# Altium PCB EEM_FMC_Carrier.PcbDoc (part 16 of 19)
Units mm, origin at the board's own origin, x right, y up, seen from the top; angles counter-clockwise.
Board outline 222.9 x 100 mm, 6 copper layers (TopLayer, MidLayer1, MidLayer2, SignalLayer1, Internal Plane 1, BottomLayer), stack 1.528 mm thick; 790 components, 743 nets, 3570 pads, 2277 vias.
Unrouted connection lines stored in the file: 3.
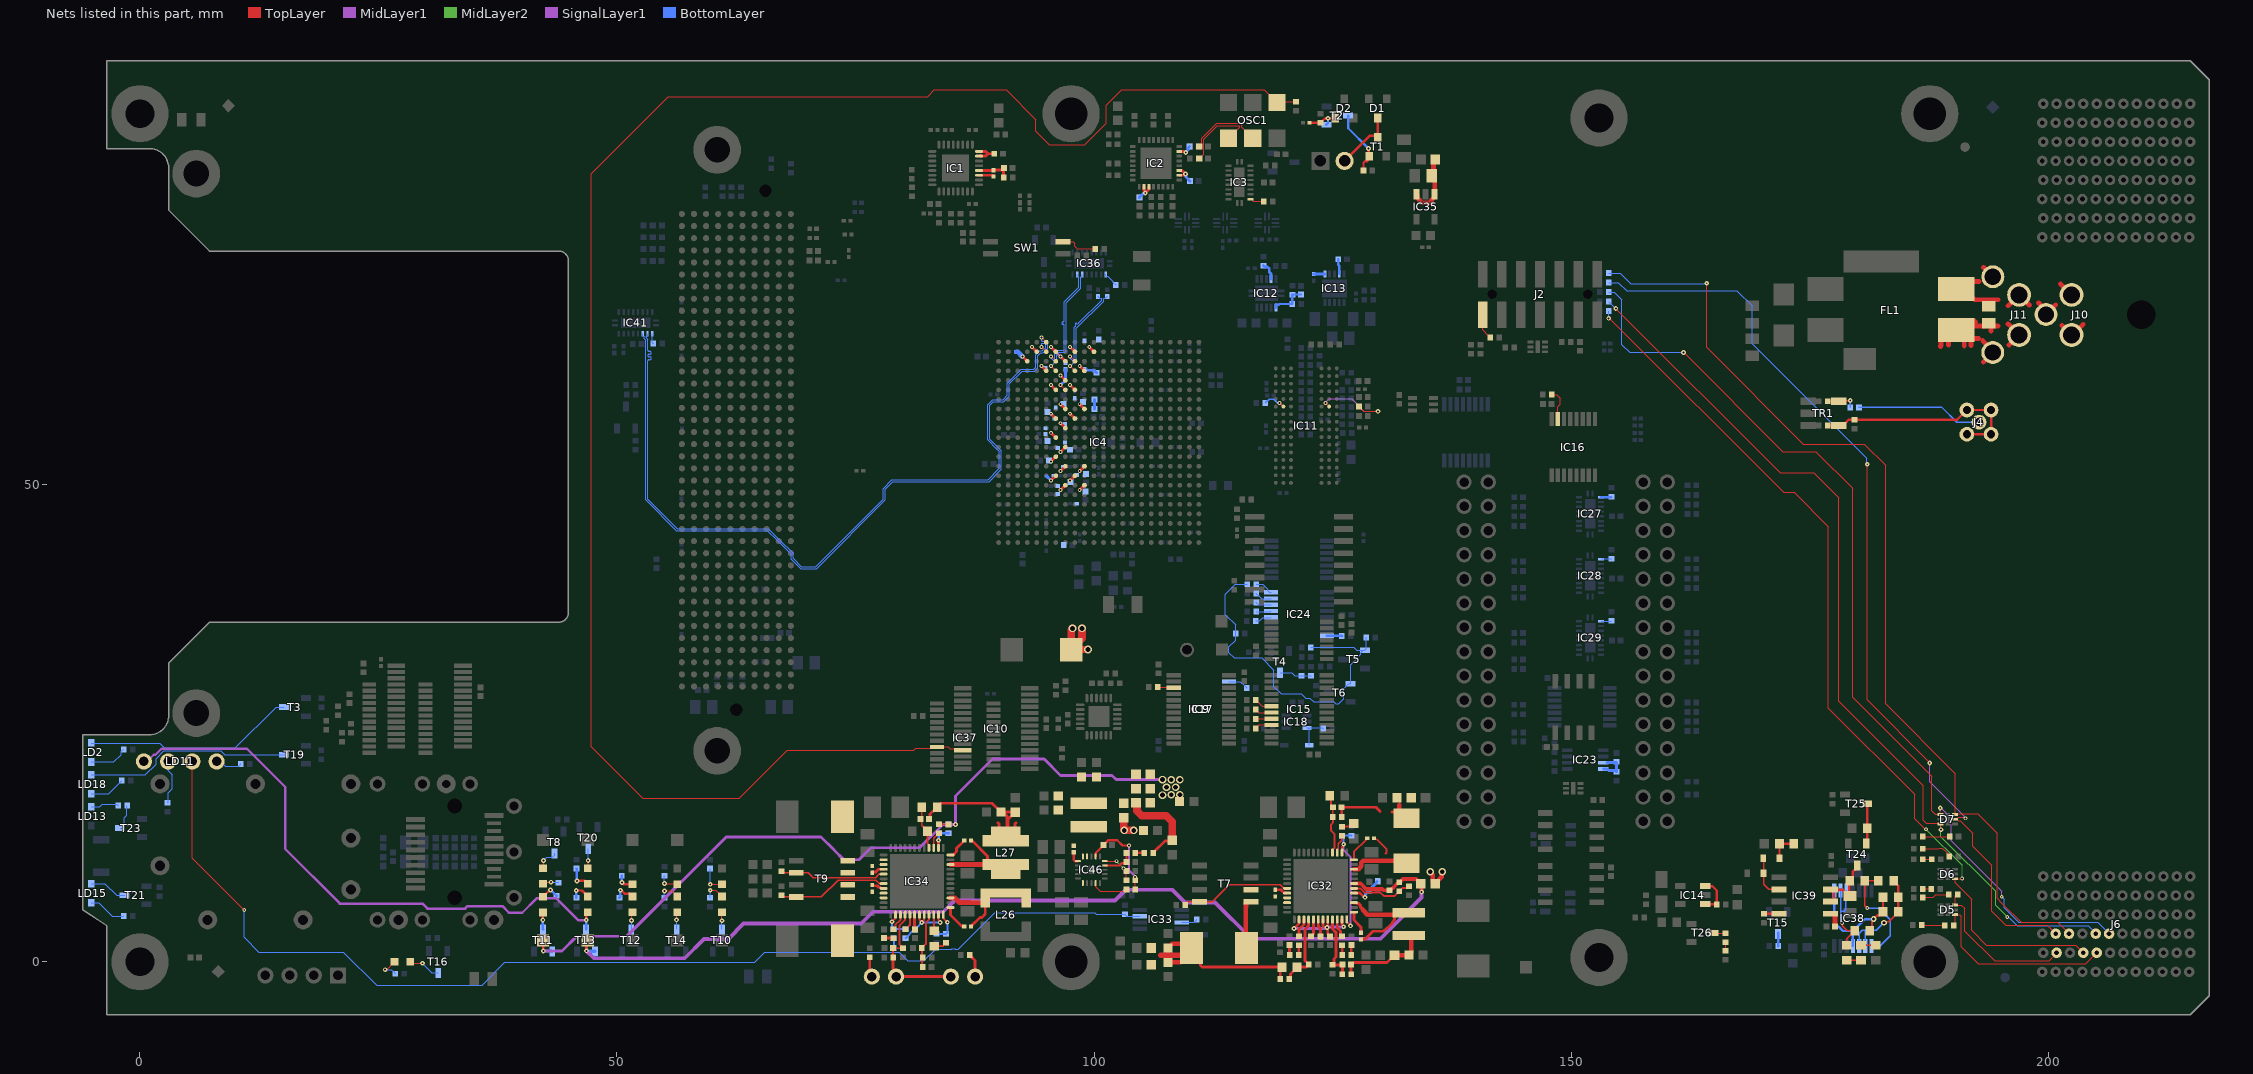
[diagram p18: the nets of this part, all layers, seen from the top]

## Via types
v1: diameter 0.4, hole 0.2, TopLayer to BottomLayer, tented both sides, 1032 vias
v2: diameter 0.5, hole 0.2, TopLayer to BottomLayer, tented both sides, 979 vias
v3: diameter 0.5, hole 0.2, TopLayer to BottomLayer, 162 vias
v4: diameter 0.8, hole 0.5, TopLayer to BottomLayer, tented both sides, 102 vias
v5: diameter 0.6, hole 0.3, TopLayer to BottomLayer, tented both sides, 2 vias

## Nets (pads, with @x,y where several pads share a name; then routed paths per layer and width w, separated by ;. In a path a pad name is that pad's centre, name@x,y a point inside that pad or via, vN(x,y) a via of type N, cw(c..) or ccw(c..) an arc to the next point about the centre after c; other vN are vias at no path point) (continued)
MGT_RXC3_N: C59.2 IC4.C9 | length 9.7
  TopLayer w0.085: v1(97.498,63.45) IC4.C9@97.998,62.95
  BottomLayer w0.085: v1(97.498,63.45) 97.558,63.39 97.558,63.239 97.741,63.056 97.811,63.056 97.948,63.193 97.948,63.288 97.948,66.495 98.052,66.598 98.082,66.629 ccw(c98.016,66.694) 98.082,66.759 98.074,66.766 cw(c98.14,66.832) 98.074,66.897 cw(c98.14,66.832) 98.205,66.897 98.212,66.89 ccw(c98.278,66.956) 98.343,66.89 98.474,67.021 100.794,69.341 100.794,69.493 100.744,69.543 100.608,69.543 100.425,69.725 C59.2@100.425,69.75
MGT_RXC3_P: C58.2 IC4.D9 | length 9.7
  TopLayer w0.085: v1(97.498,62.45) IC4.D9@97.998,61.95
  BottomLayer w0.085: v1(97.498,62.45) 97.506,62.45 98.16,63.105 98.16,66.407 98.203,66.45 101.006,69.253 101.006,69.493 101.056,69.543 101.193,69.543 101.375,69.725 C58.2@101.375,69.75
MGT_TX2_N: IC4.A6 IC41.4 | length 82.7
  TopLayer w0.085: v1(94.498,65.45) IC4.A6@94.998,64.95
  BottomLayer w0.085: IC41.4@52.7,65.825 52.7,65.65 52.783,65.568 52.794,65.568 52.844,65.518 52.844,65.312 53.013,65.143 53.013,48.412 56.225,45.2 65.775,45.2 66.725,44.25 68.25,42.725 68.25,42.212 69.249,41.213 70.913,41.213 78.112,48.412 78.112,49.525 78.912,50.325 88.993,50.325 90.291,51.623 90.291,53.584 89.075,54.8 89.075,58.325 89.45,58.7 90.55,58.7 91.125,59.275 91.125,60.575 92.456,61.907 92.723,61.907 93.273,61.907 93.77,61.907 94.117,62.254 94.117,63.542 94.4,63.825 94.688,63.825 95.166,64.304 95.166,64.808 94.995,64.98 94.919,65.056 94.548,65.056 94.498,65.106 v1(94.498,65.45)
MGT_TX2_P: IC4.B6 IC41.3 | length 82.6
  TopLayer w0.085: v1(94.498,64.45) IC4.B6@94.998,63.95
  BottomLayer w0.085: IC41.3@53.2,65.825 53.2,65.65 53.118,65.568 53.106,65.568 53.056,65.518 53.056,65.4 53.225,65.231 53.225,64.5 53.225,64.118 ccw(c53.367,64.118) 53.367,63.975 53.451,63.975 cw(c53.451,63.833) 53.594,63.833 cw(c53.451,63.833) 53.451,63.69 53.367,63.69 ccw(c53.367,63.548) 53.225,63.548 ccw(c53.367,63.548) 53.367,63.405 53.451,63.405 cw(c53.451,63.263) 53.594,63.263 cw(c53.451,63.263) 53.451,63.12 53.367,63.12 ccw(c53.367,62.978) 53.225,62.978 53.225,62.65 53.225,48.5 56.313,45.412 65.863,45.412 66.875,44.4 67.025,44.25 68.462,42.813 68.462,42.3 69.337,41.425 70.825,41.425 77.9,48.5 77.9,49.613 78.824,50.537 88.906,50.537 90.079,51.71 90.079,53.496 89.775,53.8 88.863,54.712 88.863,58.413 89.362,58.912 90.462,58.912 90.913,59.363 90.913,60.663 92.369,62.119 92.635,62.119 93.361,62.119 93.682,62.119 93.905,62.341 93.905,63.629 94.312,64.037 94.6,64.037 94.954,64.391 94.954,64.721 94.845,64.83 94.647,64.83 94.633,64.844 94.548,64.844 94.498,64.794 v1(94.498,64.45)
MGT_TX3_N: IC4.C7 IC36.8 | length 12
  TopLayer w0.085: v1(95.498,63.45) IC4.C7@95.998,62.95
  BottomLayer w0.085: v1(95.498,63.45) 95.558,63.39 95.558,63.234 95.737,63.056 95.807,63.056 95.886,63.135 95.886,63.684 96.289,64.087 96.825,64.087 96.875,64.137 96.875,66.675 96.875,66.718 ccw(c96.758,66.718) 96.758,66.835 96.751,66.835 cw(c96.751,66.953) 96.751,67.07 96.758,67.07 ccw(c96.758,67.188) 96.875,67.188 96.875,67.392 96.875,69.169 98.392,70.686 98.392,71.743 98.342,71.793 98.33,71.793 98.248,71.875 IC36.8@98.248,72.05
MGT_TX3_P: IC4.D7 IC36.7 | length 12
  TopLayer w0.085: v1(95.498,62.45) IC4.D7@95.998,61.95
  BottomLayer w0.085: v1(95.498,62.45) 95.501,62.45 96.098,63.047 96.098,63.596 96.377,63.875 96.913,63.875 97.087,64.049 97.087,67.392 97.087,69.081 98.604,70.598 98.604,71.743 98.654,71.793 98.665,71.793 98.748,71.875 IC36.7@98.748,72.05
MGTAVCC: C99.2 C170.2 C172.2 C242.2 IC4.D6 IC4.D10 IC4.E8 IC4.F7 IC4.F9 L18.2 | length 7.3
  TopLayer w0.3: v1(94.498,62.45) IC4.D6@94.998,61.95 ; v1(95.498,60.45) IC4.F7@95.998,59.95 ; v1(96.498,61.45) IC4.E8@96.998,60.95 ; v1(97.498,60.45) IC4.F9@97.998,59.95 ; v1(98.498,62.45) IC4.D10@98.998,61.95
  TopLayer w0.8: L18.2@103.1,15.1 103.1,13.848 v4(103.175,13.773) v4(104.175,13.773)
  BottomLayer w0.3: C170.2@98.998,62.1 98.998,62.075 99.048,62.025 99.302,62.025 99.316,62.011 99.987,62.011 C99.2@100.248,61.75
MGTAVTT: C156.2 C168.2 C169.2 IC4.B5 IC4.B7 IC4.B9 IC4.B11 IC4.C4 IC4.C8 L23.2 R26.1 | length 10.3
  TopLayer w0.3: v1(92.498,63.45) IC4.C4@92.998,62.95 ; v1(93.498,64.45) IC4.B5@93.998,63.95 ; v1(95.498,64.45) IC4.B7@95.998,63.95 ; v1(96.498,63.45) IC4.C8@96.998,62.95 ; v1(97.498,64.45) IC4.B9@97.998,63.95 ; v1(99.498,64.45) IC4.B11@99.998,63.95
  TopLayer w0.5: v4(135.248,9.45) 135.248,9.369 135.498,9.119 135.498,8.45 L23.2@135.748,8.2 136.441,8.893 v4@136.441,9.393
  MidLayer1 w0.3: v1(95.498,64.45) v1(96.498,63.45)
  BottomLayer w0.3: v1(96.498,63.45) 96.998,62.95 R26.1@96.998,62.78
  BottomLayer w0.5: C168.2@91.848,63.95 91.998,63.95 v1(92.498,63.45)
  other v4: 136.498,9.45
NetC3_1: C3.1 J4.1 | length 13.2
  BottomLayer w0.16: C3.1@180.174,58.117 188.883,58.117 190.433,56.567 J4.1@192.761,56.567
NetC3_2: C3.2 R1.1 TR1.4 | length 3.1
  TopLayer w0.16: R1.1@176.931,58.762 TR1.4@178.046,58.762 ; TR1.4@178.051,58.767 178.117,58.833 v2@179.264,58.833
  BottomLayer w0.16: C3.2@179.274,58.117 v2(179.274,58.842)
NetC8_2: C8.2 IC1.4 R10.1 R12.2 | length 3.6
  TopLayer w0.3: IC1.4@87.948,82.95 89.438,82.95 R10.1@89.498,83.01 ; R10.1@89.484,82.982 90.33,82.982 C8.2@90.548,83.2 ; R12.2@90.528,82.2 C8.2@90.528,83.04
NetC10_2: C10.2 IC2.2 IC2.3 | length 2.4
  TopLayer w0.3: IC2.2@108.948,82.45 109.421,82.45 109.536,82.565 v2(109.591,82.565) 109.206,82.95 IC2.3@108.948,82.95
  BottomLayer w0.3: v2(109.591,82.565) 109.629,82.527 109.629,82.269 C10.2@110.073,81.825
NetC15_2: C15.2 IC1.7 IC1.8 | length 2.8
  TopLayer w0.3: IC1.7@87.948,84.45 88.648,84.45 88.898,84.7 ; IC1.8@87.948,84.95 88.648,84.95 88.898,84.7 ; C15.2@89.548,84.7 88.898,84.7
NetC16_2: C16.2 IC2.7 | length 1.6
  TopLayer w0.3: IC2.7@108.948,84.95 109.434,84.95 109.559,84.825 v2(109.613,84.825) v2@109.613,84.771
  BottomLayer w0.3: v2(109.613,84.825) 109.613,84.85 109.863,85.101 109.863,85.315 C16.2@110.023,85.475
NetC21_2: C21.2 IC2.26 IC2.27 | length 2.1
  TopLayer w0.3: v2@105.248,80.779 IC2.26@105.248,81.25 ; v2(105.373,80.6) 105.748,80.975 IC2.27@105.748,81.25
  BottomLayer w0.3: C21.2@104.748,80.125 105.185,80.562 105.335,80.562 v2(105.373,80.6)
NetC60_1: C60.1 IC46.6 IC46.19 IC46.20 L8.1
NetC60_2: C60.2 IC46.1 | length 1.3
  TopLayer w0.25: C60.2@97.875,11.475 97.875,10.7 98.025,10.55 IC46.1@98.325,10.55
NetC73_1: C73.1 D2.1 R34.1 T2.1 | length 3.7
  TopLayer w0.25: C73.1@122.598,87.95 R34.1@123.748,87.95 123.768,87.95 123.933,88.115 123.933,88.135 124.181,88.383 124.481,88.383 v2(124.523,88.425) 124.568,88.38 125.218,88.38 D2.1@125.298,88.3
  BottomLayer w0.25: T2.1@124.348,87.75 124.523,87.925 v2(124.523,88.425)
NetC92_2: C92.2 IC12.1 R71.2 R72.2 | length 3.9
  BottomLayer w0.25: IC12.1@119.07,68.573 119.07,68.848 119.095,68.873 119.37,68.873 119.447,68.95 R71.2@120.778,68.95 120.778,69.911 R72.2@120.795,69.928 120.815,69.948 C92.2@121.695,69.948
NetC154_2: C154.2 IC39.6 IC39.7 R265.2 T24.3 | length 6.5
  TopLayer w0.25: IC39.6@177.55,6.34 177.55,7.548 178.519,7.548 178.666,7.401 178.666,7.298 C154.2@178.988,6.976 ; C154.2@179.241,6.898 179.153,6.985 179.153,8.453 179.525,8.825 179.525,8.996 179.55,9.021 179.55,9.45 180,9.9 T24.3@180,10.1
NetC165_2: C165.2 IC39.5 | length 1.8
  TopLayer w0.5: IC39.5@177.198,5.045 177.633,5.045 177.683,4.995 C165.2@177.683,3.713
NetC166_2: C166.2 D13.1 R268.2 | length 3
  TopLayer w0.25: D13.1@171.86,10.85 171.857,10.854 C166.2@171.857,12.361 171.861,12.365 R268.2@173.345,12.365
NetC186_2: C186.2 IC23.7 IC23.8 R101.1 | length 3.5
  BottomLayer w0.3: IC23.8@153.398,20.225 153.748,20.225 153.923,20.05 154.643,20.05 R101.1@154.773,19.92 154.773,20.9 IC23.7@153.785,20.9
NetC201_2: C201.2 IC35.1 IC35.3 L29.2 | length 6.8
  TopLayer w0.5: IC35.3@133.8,80.472 IC35.3@133.8,80.452 133.85,80.402 133.85,80.152 134.111,79.891 134.111,79.762 134.31,79.563 135.19,79.563 135.389,79.762 135.389,79.891 135.7,80.202 IC35.1@135.7,80.452 ; C201.2@135.4,82.402 135.4,82.227 135.709,81.918 IC35.1@135.709,80.461 ; C201.2@135.4,82.577 135.587,82.764 135.587,83.912 L29.2@135.775,84.1
NetC227_1: C227.1 IC32.40 R184.1 R185.2 | length 8
  TopLayer w0.3: R184.1@120.468,-1.8 120.608,-1.66 120.608,-1.265 121.298,-0.575 C227.1@121.298,-0.55 122.278,-0.55 122.368,-0.46 122.388,-0.46 122.528,-0.32 R185.2@122.528,-0.3 122.528,-0.28 122.388,-0.14 122.368,-0.14 122.123,0.105 122.123,3.4 122.498,3.775 IC32.40@122.498,4.45
NetC227_2: C227.2 C228.2 C229.2 L9.1 L10.2 L11.1 R184.2 | length 20.2
  TopLayer w0.3: L10.2@110.498,0.2 110.848,0.2 111.148,-0.1 111.148,-0.374 111.324,-0.55 C227.2@119.698,-0.55 119.528,-0.72 R184.2@119.528,-1.8
  TopLayer w0.5: C229.2@107.748,1.2 107.748,0.7 C228.2@107.748,-0.05 109.098,-0.05 109.348,0.2 L10.2@109.498,0.2 ; C229.2@107.748,1.45 108.198,1.9 109.648,1.9 L10.2@110.098,1.45
  TopLayer w0.6: 106.998,0.7 107.748,0.7 109.348,0.7 L10.2@110.098,1.45
NetC237_1: C237.1 IC32.33 IC32.34 L10.1 T7.5 T7.6 | length 5.4
  TopLayer w0.5: L10.1@115.898,1.45 115.898,5.745 115.923,5.77 115.923,6.245 115.973,6.295 T7.5@116.448,6.295
NetC237_2: C237.2 IC32.32 | length 1.4
  TopLayer w0.3: C237.2@118.998,7.55 119.573,7.55 119.812,7.311 119.862,7.311 119.973,7.2 IC32.32@120.248,7.2
NetC238_2: C238.2 R189.1 | length 1.1
  TopLayer w0.3: C238.2@120.498,1.75 120.498,0.73 R189.1@120.528,0.7
NetC241_2: C241.2 IC46.17 R196.1 R289.1 | length 9.5
  TopLayer w0.125: R196.1@104.345,7.6 R289.1@104.345,8.55
  TopLayer w0.25: IC46.17@100.175,11.05 100.175,11.4 C241.2@101,12.225 101.376,12.601 101.376,12.624 101.501,12.749 102.43,12.749 102.992,12.187 v1(103.663,12.187) ; v1(104.305,8.901) 104.325,8.881 104.325,8.57 R289.1@104.345,8.55
  SignalLayer1 w0.25: v1(103.663,12.187) 103.663,9.587 104.23,9.02 104.23,9.017 104.305,8.942 v1(104.305,8.901)
NetC248_1: C248.1 IC32.3 L19.1 | length 12.9
  TopLayer w0.3: C248.1@127.998,2.35 128.029,2.381 128.429,2.381 129.248,3.2 130.348,3.2 130.709,3.561 130.776,3.561 131.273,4.058 131.273,4.175 131.502,4.404 131.502,4.795 131.646,4.939 131.842,5.135 L19.1@132.998,5.135
  TopLayer w0.35: IC32.3@127.248,6.2 127.273,6.175 127.498,6.175 127.559,6.114 127.694,6.114 127.937,5.871 127.937,5.711 128.173,5.475
  TopLayer w0.5: 128.173,5.475 128.434,5.214 128.434,5.16 128.655,4.939 131.646,4.939 132.802,4.939 L19.1@132.998,5.135
NetC248_2: C248.2 IC32.1 | length 2.5
  TopLayer w0.3: IC32.1@127.248,5.2 127.248,4.377 127.998,3.627 C248.2@127.998,3.05
NetC249_2: C249.2 R201.1 | length 1.1
  TopLayer w0.3: R201.1@126.968,0.7 126.968,1.72 C249.2@126.998,1.75
NetC250_2: C250.2 C252.2 L19.2 L20.1 R203.2 | length 9.4
  TopLayer w0.3: R203.2@126.968,-1.3 126.948,-1.28 C252.2@126.948,-0.3 127.108,-0.14 127.219,-0.14 127.284,-0.075 130.723,-0.075 L20.1@131.498,0.7
  TopLayer w0.5: L20.1@131.498,0.7 C250.2@132.998,0.7 ; L19.2@132.998,2.765 133.008,2.765 133.248,2.525 C250.2@133.248,0.95
NetC252_1: C252.1 IC32.45 R203.1 R205.2 | length 6.9
  TopLayer w0.3: IC32.45@124.998,4.45 124.998,3.45 125.348,3.1 125.348,0.5 125.158,0.31 125.158,-0.33 126.018,-0.33 C252.1@126.048,-0.3 126.048,-1.28 R203.1@126.028,-1.3
NetC253_1: C253.1 IC32.10 L21.1 | length 8.9
  TopLayer w0.2: C253.1@129.348,12.95 129.448,12.85 129.612,12.85 130.664,11.798 130.664,11.434 130.573,11.343
  TopLayer w0.49: 127.865,9.858 128.012,10.005 128.012,10.393
  TopLayer w0.5: IC32.10@127.248,9.7 127.259,9.711 127.726,9.711 127.919,9.904 ; 128.012,10.393 128.208,10.589 130.228,10.589 132.809,10.589 L21.1@133.048,10.35
NetC253_2: C253.2 IC32.12 | length 2.8
  TopLayer w0.2: IC32.12@127.248,10.7 127.248,11.525 128.523,12.8 128.523,12.85 128.623,12.95 C253.2@128.648,12.95
NetC254_2: C254.2 R206.1 | length 1.4
  TopLayer w0.2: R206.1@125.998,14.17 126.918,14.17 C254.2@127.248,14.5
NetC255_2: C255.2 C256.2 L21.2 L22.1 R209.2 | length 13.9
  TopLayer w0.3: R209.2@125.968,15.2 125.968,16.18 C256.2@125.948,16.2 129.548,16.2 129.973,15.775 ; 131.248,15.7 L21.2@132.123,15.7 ; C255.2@131.748,17.2 C255.2@131.998,17.45 ; L21.2@131.998,15.7 L21.2@132.123,15.7 ; L21.2@132.086,15.838 L21.2@132.223,15.7 ; L21.2@132.311,15.613 L21.2@132.873,15.05 ; L21.2@132.311,15.787 L21.2@132.398,15.7 ; L21.2@132.911,15.187 L21.2@133.048,15.05 ; L22.1@132.998,17.45 L22.1@133.248,17.2 ; L21.2@132.123,15.7 L21.2@132.223,15.7 ; L21.2@132.223,15.7 131.998,15.925 132.173,15.925 L21.2@132.398,15.7 ; L21.2@132.223,15.7 L21.2@132.873,15.05 ; L21.2@132.223,15.7 L21.2@132.398,15.7 ; L21.2@132.398,15.7 L21.2@133.048,15.05 ; L21.2@132.873,15.05 L21.2@133.048,15.05
  TopLayer w0.5: 131.998,16.45 131.998,15.925 131.998,15.825 132.123,15.7 L21.2@132.773,15.05 ; L21.2@132.261,15.563 L21.2@132.773,15.05 ; L21.2@132.873,15.05 L21.2@132.773,15.05
NetC256_1: C256.1 IC32.16 R209.1 R211.2 | length 6.2
  TopLayer w0.2: R211.2@124.698,17.2 124.838,17.06 124.838,16.41 C256.1@125.048,16.2 125.028,16.18 125.028,15.22 125.048,15.2 125.048,14.574 124.859,14.385 124.859,13.735 125.212,13.382 125.212,11.966 124.998,11.752 IC32.16@124.998,11.45
NetC258_2: C258.2 IC32.38 IC32.43 IC32.44 IC32.47 | length 10.4
  TopLayer w0.3: v2(120.973,3.5) 121.498,4.025 IC32.38@121.498,4.45 ; IC32.43@123.998,4.45 123.998,3.776 124.174,3.6 v2(124.423,3.6) v2@124.498,3.675 ; IC32.44@124.498,4.45 v2@124.498,3.675 ; C258.2@124.748,2.65 124.498,2.9 v2@124.498,3.675 ; IC32.47@125.998,4.45 125.998,3.85 v2(126.173,3.675)
  SignalLayer1 w0.3: v2(120.973,3.5) v2@124.423,3.5 ; v2(124.423,3.6) 124.461,3.638 124.603,3.638 124.633,3.668 126.081,3.668 126.087,3.675 v2(126.173,3.675)
NetC259_2: C259.2 IC32.42 | length 1.9
  TopLayer w0.3: IC32.42@123.498,4.45 123.498,3.726 123.748,3.476 C259.2@123.748,2.65
NetC261_1: C261.1 IC34.40 R215.1 R217.2 W1.1 W2.1 | length 13.9
  TopLayer w0.2: R215.1@78.968,0.45 78.948,0.47 C261.1@78.948,1.45 78.978,1.42 79.978,1.42 79.788,1.61 79.788,1.63 79.623,1.795 79.623,3.825 80.2,4.402 IC34.40@80.2,4.949
  TopLayer w0.3: R215.1@78.948,0.47 78.948,-0.674 78.98,-0.706 78.98,-1.282 W2.1@79.248,-1.55 W1.1@84.998,-1.55
NetC264_1: C264.1 FL1.3 J10.1 J10.2 J11.2 J11.3 | length 16.5
  TopLayer w0.5: 192.758,71.309 191.183,71.309 FL1.3@190.383,70.509 191.383,69.509 192.227,69.509 192.326,69.41 194.776,69.41 ; 193.238,72.786 J11.3@194.216,71.809 ; 199.001,69.087 199.788,68.3 J11.2@199.788,67.844 200.208,68.263 200.815,68.87 ; 201.303,71.071 J10.1@202.465,69.909 ; 201.463,66.712 J10.2@202.465,65.709 ; J10.2@202.983,65.709 203.033,65.709 203.033,66.176 203.697,66.84
NetC264_2: C264.2 FL1.1 J10.3 J10.4 J11.1 | length 27.3
  TopLayer w0.5: 188.733,64.509 188.733,64.559 188.778,64.604 188.778,65.209 189.778,66.209 FL1.1@190.383,66.209 ; 189.558,64.634 189.558,65.384 FL1.1@190.383,66.209 ; 191.208,64.559 FL1.1@191.208,65.384 ; 191.933,64.609 191.933,65.209 FL1.1@191.808,65.334 ; 192.433,67.034 192.308,67.159 191.333,67.159 FL1.1@190.833,66.659 ; 192.708,65.334 FL1.1@191.808,65.334 ; 193.166,65.122 194.211,64.078 J11.1@194.211,63.872 193.201,62.862 ; 194.033,66.109 C264.2@194.033,66.659 ; 194.758,66.659 C264.2@194.033,66.659 ; 195.816,66.858 J10.4@196.965,65.709 195.921,64.665 ; 195.818,68.761 J10.3@196.965,69.909 198.059,68.815 ; FL1.1@190.383,66.209 FL1.1@190.833,66.659 ; FL1.1@190.383,66.209 FL1.1@191.208,65.384 ; FL1.1@190.383,66.209 190.933,66.209 FL1.1@191.808,65.334 ; FL1.1@190.833,66.659 193.533,66.659 C264.2@193.783,66.909 C264.2@194.033,66.659 ; FL1.1@191.208,65.384 191.259,65.334 FL1.1@191.808,65.334
NetC270_1: C270.1 IC34.33 IC34.34 L24.1 T9.5 T9.6
NetC270_2: C270.2 IC34.32 | length 1.4
  TopLayer w0.3: C270.2@76.748,8.05 76.748,8.025 76.798,7.975 77.279,7.975 77.444,7.81 77.564,7.81 77.675,7.699 IC34.32@77.95,7.699
NetC271_2: C271.2 R220.1 | length 1
  TopLayer w0.3: C271.2@77.998,2.5 78.978,2.5 R220.1@78.998,2.48
NetC275_1: C275.1 IC34.26 IC34.27 L25.1 T9.7 T9.8
NetC275_2: C275.2 IC34.28 | length 1.4
  TopLayer w0.3: C275.2@76.748,9.35 76.748,9.375 76.798,9.425 77.123,9.425 77.397,9.699 IC34.28@77.95,9.699
NetC276_1: C276.1 IC34.3 L26.1 | length 7.2
  TopLayer w0.3: C276.1@87.098,3.7 87.123,3.7 87.173,3.75 87.173,3.775 88.048,4.65 88.248,4.65 88.605,5.007 L26.1@88.605,6.225
  TopLayer w0.5: IC34.3@84.95,6.699 85.417,6.699 85.684,6.432 85.684,6.41 85.883,6.211 86.987,6.211 86.998,6.2 88.58,6.2 L26.1@88.605,6.225
NetC276_2: C276.2 IC34.1 | length 2.7
  TopLayer w0.3: IC34.1@84.95,5.699 84.95,4.898 86.098,3.75 86.348,3.75 C276.2@86.398,3.7
NetC277_2: C277.2 R229.1 | length 1.4
  TopLayer w0.2: R229.1@83.248,1.65 84.148,1.65 C277.2@84.498,2
NetC279_1: C279.1 IC34.45 R230.1 R232.2 | length 5.9
  TopLayer w0.2: C279.1@82.048,-0.55 81.968,-0.47 R232.2@81.968,1.45 81.968,1.47 82.158,1.66 82.178,1.66 82.387,1.869 82.387,3.307 82.373,3.321 82.373,3.929 82.387,3.943 82.387,4.114 82.7,4.427 IC34.45@82.7,4.949
NetC280_1: C280.1 IC34.10 L27.1 | length 9.1
  TopLayer w0.3: C280.1@87.098,12.7 87.148,12.65 87.273,12.65 88.849,11.074 88.849,10.273 L27.1@88.923,10.199
  TopLayer w0.5: IC34.10@84.95,10.199 88.923,10.199 L27.1@90.748,10.2
NetC280_2: C280.2 IC34.12 | length 2.3
  TopLayer w0.3: IC34.12@84.95,11.199 85.247,11.199 85.598,11.55 85.598,11.9 86.323,12.625 86.323,12.65 86.373,12.7 C280.2@86.398,12.7
NetC281_2: C281.2 R234.1 | length 1
  TopLayer w0.2: R234.1@83.748,14.42 84.728,14.42 C281.2@84.748,14.4
NetC282_2: C282.2 C283.2 L27.2 L28.1 R239.2 | length 17.3
  TopLayer w0.3: C283.2@82.698,14.95 82.826,15.078 82.826,15.478 83.198,15.85 83.248,15.85 83.548,16.15 R239.2@83.548,16.2 83.548,16.25 83.848,16.55 83.898,16.55 83.973,16.625 89.323,16.625 C282.2@90.248,15.7 ; 89.923,14.575 90.024,14.474 90.024,14.05 90.324,13.75 L27.2@90.748,13.75 91.422,13.75 91.722,14.05 91.722,14.474 91.823,14.575 ; L27.2@90.948,14.125 90.873,14.2 90.873,15.274 90.697,15.45 90.498,15.45 C282.2@90.248,15.7 ; 90.998,14.25 90.998,14.95 L28.1@91.748,15.7 ; L28.1@91.798,15.65 L28.1@91.748,15.7 ; C282.2@90.248,15.7 L28.1@91.748,15.7
NetC283_1: C283.1 IC34.16 R239.1 R240.2 | length 4.6
  TopLayer w0.2: R239.1@81.948,16.2 81.948,14.3 82.148,14.1 82.198,14.1 82.548,13.75 R240.2@82.548,13.7 82.548,12.391 82.7,12.239 IC34.16@82.7,11.949
NetC284_2: C284.2 IC34.43 IC34.44 IC34.47 R242.1 | length 7.1
  TopLayer w0.2: IC34.43@81.7,4.949 81.7,4.392 81.948,4.145 v2@81.948,4.14 ; v2(81.948,4.125) v2@81.948,4.14 ; IC34.44@82.2,4.949 82.2,4.392 v2@81.948,4.14 ; IC34.47@83.7,4.949 83.7,4.379 83.873,4.206 v2(83.873,4.125)
  BottomLayer w0.2: R242.1@80.248,2.48 80.268,2.48 80.458,2.67 80.458,2.69 80.958,3.19 81.038,3.19 81.458,3.61 81.458,3.635 v2(81.948,4.125) v2(83.873,4.125)
NetC285_2: C285.2 IC34.42 | length 1.6
  TopLayer w0.3: IC34.42@81.2,4.949 81.2,3.448 C285.2@81.248,3.4
NetC305_2: C305.2 IC13.6 | length 1.2
  BottomLayer w0.3: C305.2@123.025,72.094 IC13.6@124.2,72.094
NetD1_3: D1.3 J1.2 T1.1 | length 6.3
  TopLayer w0.25: J1.2@126.268,83.948 128.92,86.6 129.748,86.6 D1.3@129.748,88.3
NetD4_1: D4.1 IC18.6 R97.1 | length 3.9
  BottomLayer w0.125: D4.1@122.548,22.7 122.548,24.388 122.41,24.525 IC18.6@122.323,24.525 122.348,24.55 R97.1@123.928,24.55 ; R97.1@123.928,24.55 R97.1@124.028,24.45 R97.1@123.928,24.55
NetD5_4: D5.4 J6.H2 R133.2 | length 20.5
  TopLayer w0.114: R133.2@190.095,3.8 190.254,3.959 190.254,4.946 D5.4@190.258,4.95 190.725,4.95 190.9,4.775 190.9,1.575 192.675,-0.2 203.95,-0.2 J6.H2@205.1,0.95
NetD5_6: D5.6 J6.K2 R138.2 | length 16.3
  TopLayer w0.114: D5.6@190.25,5.999 190.25,6.934 190.579,7.263 R138.2@190.579,7.283 ; D5.6@190.258,5.95 190.925,5.95 191.275,5.6 191.275,3.225 194.398,0.102 200.152,0.102 200.9,0.85 J6.K2@200.9,0.95
NetD6_4: D6.4 J6.I2 R137.2 | length 95.1
  TopLayer w0.125: v2(153.948,67.45) 154.049,67.45 154.183,67.317 172.3,49.2 173.375,49.2 176.975,45.6 176.975,26.6 186.025,17.55 186.025,14.975 187.001,13.999 187.027,13.999 187.126,13.9 v1(187.2,13.9) ; v1(191,8.725) 190.975,8.7 D6.4@190.258,8.7 190.264,8.694 190.264,8.286 192,6.55 192,3.313 193.55,1.763 202.888,1.763 J6.I2@203.7,0.95
  MidLayer2 w0.125: v1(187.2,13.9) 191,10.1 v1(191,8.725)
  BottomLayer w0.125: v2(153.948,67.45) 153.968,67.47 R137.2@153.968,68.2
NetD7_1: D7.1 J6.G3 R139.2 | length 101.3
  TopLayer w0.125: v2(161.8,63.875) 172.2,53.475 175.675,53.475 179.525,49.625 179.525,27.725 187.8,19.45 187.8,15.825 188.175,15.45 D7.1@188.738,15.45 D7.1@188.654,15.534 ; D7.1@188.7,15.534 v2(188.7,16.125)
  SignalLayer1 w0.125: v2(188.7,16.125) 188.75,16.125 189.85,15.025 189.85,12.675 195.15,7.375 v1(195.15,6.825)
  BottomLayer w0.114: R139.2@153.968,70.2 154.523,70.2 155.323,69.4 155.323,64.696 156.144,63.875 v2(161.8,63.875) ; 195.4,5.65 196.907,4.143 205.207,4.143 J6.G3@206.4,2.95
  BottomLayer w0.125: v1(195.15,6.825) 195.4,6.575 195.4,5.65
NetD7_3: D7.3 J6.H3 R135.2 | length 94.7
  TopLayer w0.114: v2(154.698,68.47) 171.918,51.25 175.425,51.25 178.05,48.625 178.05,42.835
  TopLayer w0.125: 178.05,42.835 178.05,27.325 186.898,18.477 186.898,14.852 187.25,14.5 D7.3@188.738,14.5 ; D7.3@188.738,14.45 188.775,14.413 v2(188.775,13.85)
  MidLayer2 w0.125: v2(188.775,13.85) 188.775,13.1 194.5,7.375 194.5,5.925 v1(195.725,4.7)
  BottomLayer w0.114: R135.2@153.968,69.2 153.968,69.18 154.201,68.947 154.221,68.947 v2(154.698,68.47) ; 196.75,3.794 204.231,3.794 205,3.025 J6.H3@205,2.95
  BottomLayer w0.125: v1(195.725,4.7) 195.799,4.7 195.889,4.61 195.934,4.61 196.75,3.794
NetD7_5: D7.5 J6.K3 R134.2 | length 99.2
  TopLayer w0.125: v2(181.05,52.15) 181.05,27.45 v2@187.625,20.875 ; D7.5@190.258,14.95 D7.5@190.423,14.95 ; v1(191.35,15.044) 191.276,15.044 191.17,15.149 190.627,15.149 190.516,15.038 190.511,15.038 D7.5@190.423,14.95 ; J6.K3@200.8,2.95 199.925,3.825 195.575,3.825 194.1,5.3 194.1,10.1 192.1,12.1 192.1,13.47 190.776,14.794 190.579,14.794 D7.5@190.423,14.95
  SignalLayer1 w0.125: v2(187.6,20.85) 187.6,18.875 191.242,15.233 191.242,15.226 191.35,15.118 v1(191.35,15.044)
  BottomLayer w0.125: R134.2@153.968,71.2 154.969,71.2 155.816,70.353 167.397,70.353 169,68.75 169,64.775 181.016,52.759 181.016,52.184 v2(181.05,52.15)
NetD7_6: D7.6 J6.J3 R132.2 | length 102.1
  TopLayer w0.125: v2(164.225,71.125) 164.225,64.4 174.35,54.275 180.75,54.275 182.975,52.05 182.975,27.025 190.262,19.738 190.262,15.525 190.262,15.454 D7.6@190.258,15.45 ; D7.6@190.295,15.525 192.625,15.525 194.675,13.475 194.675,6.638 195.048,6.264 195.048,6.254 195.254,6.048 195.264,6.048 197.175,4.137 201.013,4.137 J6.J3@202.2,2.95
  BottomLayer w0.125: R132.2@153.968,72.2 155.169,72.2 156.269,71.1 164.2,71.1 v2(164.225,71.125)
NetD12_2: D12.2 D13.2 IC39.2 | length 4.5
  TopLayer w0.15: D13.2@170.177,10.802 D12.2@170.177,9.302 170.177,8.123 170.715,7.585 IC39.2@171.798,7.585
NetIC1_3: IC1.3 R10.2 | length 1.6
  TopLayer w0.3: IC1.3@87.948,82.45 89.438,82.45 89.498,82.39 R10.2@89.498,82.37
NetIC3_2: IC3.2 R23.1 | length 1.6
  TopLayer w0.125: IC3.2@116.398,79.95 116.573,79.95 116.635,79.888 116.635,79.773 116.709,79.7 R23.1@117.778,79.7
NetIC4_F8: IC4.F8 R26.2 | length 2.6
  TopLayer w0.125: v1(96.498,60.45) IC4.F8@96.998,59.95
  BottomLayer w0.3: v1(96.498,60.45) 96.998,60.95 R26.2@96.998,62.12
NetIC9_3: IC9.3 R271.1 | length 1.7
  TopLayer w0.125: R271.1@106.693,28.8 108.273,28.8 IC9.3@108.348,28.725
NetIC11_L2: IC11.L2 R67.2 | length 9
  TopLayer w0.125: R67.2@127.778,58.2 127.778,58.18 128.005,57.953 128.025,57.953 128.278,57.7 v2(129.773,57.7)
  TopLayer w0.167: v1(124.251,58.585) 124.263,58.585 IC11.L2@124.648,58.2
  SignalLayer1 w0.125: v1(124.251,58.585) 124.666,59 126.998,59 128.298,57.7 v2(129.773,57.7)
NetIC11_L8: IC11.L8 R68.2 | length 2.4
  TopLayer w0.167: v1(119.451,58.585) 119.463,58.585 IC11.L8@119.848,58.2
  BottomLayer w0.15: R68.2@117.968,58.575 117.968,58.595 118.183,58.81 118.203,58.81 118.382,58.989 118.824,58.989 119.189,58.624 119.413,58.624 v1(119.451,58.585)
NetIC12_9: IC12.9 R70.1 | length 1.9
  BottomLayer w0.3: R70.1@117.748,72.98 117.888,72.84 118.188,72.84 118.364,72.664 118.364,72.314 118.57,72.107 IC12.9@118.57,71.573
NetIC13_9: IC13.9 R73.1 | length 1.6
  BottomLayer w0.254: R73.1@125.58,73.644 125.58,73.064 125.7,72.944 IC13.9@125.7,72.094
NetIC14_1: IC14.1 IC14.3 R263.2 | length 4.1
  TopLayer w0.25: IC14.3@164.05,7.95 164.079,7.921 164.829,7.921 165.28,7.47 R263.2@165.28,6 ; IC14.1@164.075,6.025 R263.2@165.255,6.025
NetIC15_18: IC15.18 R91.1 | length 1.9
  TopLayer w0.125: R91.1@116.968,27.45 116.968,27.43 117.195,27.203 117.215,27.203 117.643,26.775 IC15.18@118.598,26.775
NetIC15_19: IC15.19 R90.1 | length 1.8
  TopLayer w0.125: R90.1@116.968,26.45 116.968,26.43 117.195,26.203 117.215,26.203 117.293,26.125 IC15.19@118.598,26.125
NetIC15_20: IC15.20 R89.1 | length 1.6
  TopLayer w0.125: R89.1@116.968,25.45 116.993,25.475 IC15.20@118.598,25.475
NetIC15_21: IC15.21 R88.1 | length 1.8
  TopLayer w0.125: R88.1@116.968,24.45 116.968,24.47 117.195,24.697 117.215,24.697 117.343,24.825 IC15.21@118.598,24.825
NetIC16_15: IC16.15 R95.2 | length 3.3
  TopLayer w0.125: R95.2@147.968,59.45 148.498,59.45 148.878,59.07 148.878,58.444 148.623,58.189 IC16.15@148.623,56.9
NetIC17_14: IC17.14 R272.2 | length 2.2
  BottomLayer w0.125: IC17.14@114.148,29.375 115.353,29.375 115.781,28.947 115.801,28.947 116.028,28.72 R272.2@116.028,28.7
NetIC24_4: IC24.4 R112.1 | length 1.8
  BottomLayer w0.125: R112.1@116.945,35.725 117.375,35.725 117.708,36.058 118.493,36.058 IC24.4@118.56,36.125
NetIC24_5: IC24.5 R104.1 | length 1.6
  BottomLayer w0.125: R104.1@116.995,36.7 118.485,36.7 IC24.5@118.56,36.775
NetIC24_6: IC24.6 R106.1 | length 1.7
  BottomLayer w0.125: R106.1@117.022,37.675 117.022,37.655 117.25,37.428 117.32,37.428 117.323,37.425 IC24.6@118.56,37.425
NetIC24_7: IC24.7 R110.1 | length 1.8
  BottomLayer w0.125: R110.1@117.02,38.625 117.02,38.605 117.247,38.378 117.267,38.378 117.57,38.075 IC24.7@118.56,38.075
NetIC24_8: IC24.8 R111.2 | length 2
  BottomLayer w0.125: R111.2@117.02,39.575 117.71,39.575 118.221,39.064 118.221,38.887 118.383,38.725 IC24.8@118.56,38.725
NetIC24_16: IC24.16 R107.2 | length 1.6
  BottomLayer w0.3: IC24.16@124.436,34.175 125.955,34.175 R107.2@125.98,34.15
NetIC27_2: IC27.2 R181.1 | length 1.1
  BottomLayer w0.3: IC27.2@153.148,48.7 R181.1@154.218,48.7
NetIC28_2: IC28.2 R182.1 | length 1.1
  BottomLayer w0.125: IC28.2@153.178,42.23 R182.1@154.248,42.23
NetIC29_2: IC29.2 R183.1 | length 1.1
  BottomLayer w0.09: IC29.2@153.148,35.7 R183.1@154.218,35.7
NetIC32_5: IC32.5 R208.1 R210.2 | length 3.5
  TopLayer w0.3: IC32.5@127.248,7.2 127.898,7.2 128.342,6.756 v2(128.396,6.756)
  BottomLayer w0.3: v2(128.396,6.756) 128.434,6.795 128.434,7.086 128.778,7.43 128.778,7.47 128.918,7.61 128.938,7.61 129.578,8.25 129.578,8.305 R208.1@129.673,8.4
NetIC32_6: IC32.6 R214.1 R216.2 | length 6.5
  TopLayer w0.2: IC32.6@127.248,7.7 127.91,7.7 128.36,7.25 130.023,7.25 130.373,6.9 131.498,6.9 131.978,7.38 R214.1@131.998,7.38 132.018,7.38 132.388,7.75 132.828,7.75 R216.2@132.998,7.92
NetIC32_14: IC32.14 IC32.48 R200.1 R204.2 | length 12.6
  TopLayer w0.2: IC32.14@125.998,11.45 125.998,12.069 126.173,12.244 v2(126.173,12.325) ; IC32.48@126.498,4.45 126.498,4.175 v2(126.898,3.775)
  SignalLayer1 w0.2: v2(126.173,12.325) 126.173,11.7 126.898,10.975 v2(126.898,3.775)
  BottomLayer w0.2: v2(126.173,12.325) 126.173,13.055 R204.2@125.998,13.23 R200.1@126.998,13.23
NetIC32_15: IC32.15 R206.2 | length 2
  TopLayer w0.2: IC32.15@125.498,11.45 125.498,11.752 125.602,11.856 125.602,12.379 125.98,12.757 125.98,13.212 R206.2@125.998,13.23
NetIC32_31: IC32.31 R192.1 T7.4 | length 11.8
  TopLayer w0.15: R192.1@109.498,5.98 109.518,5.98 109.733,6.195 109.733,6.207 109.821,6.295 T7.4@111.048,6.295 112.418,6.295 114.198,8.075 119.523,8.075 119.823,7.775 119.857,7.775 119.932,7.7 IC32.31@120.248,7.7
NetIC32_39: IC32.39 R190.2 | length 2
  TopLayer w0.3: R190.2@121.498,2.67 121.498,3.425 121.998,3.925 IC32.39@121.998,4.45
NetIC32_41: IC32.41 R212.2 | length 1.9
  TopLayer w0.3: R212.2@122.748,2.67 122.768,2.67 122.908,2.81 122.908,2.83 122.998,2.92 IC32.41@122.998,4.45
NetIC32_46: IC32.46 R202.2 | length 2
  TopLayer w0.3: IC32.46@125.498,4.45 125.498,3.575 125.838,3.235 125.838,2.81 125.978,2.67 R202.2@125.998,2.67
NetIC33_3: IC33.3 LD11.3 R188.1 | length 120.7
  TopLayer w0.125: LD11.3@5.49,21 5.49,10.86 v1(10.925,5.425)
  BottomLayer w0.125: v1(10.925,5.425) 10.925,2.55 12.45,1.025 21.325,1.025 24.8,-2.45 35.85,-2.45 38.25,-0.05 64.45,-0.05 65.5,1 78.664,1 78.675,0.989 79.381,0.989 79.392,1 79.573,1 80.473,0.1 82.173,0.1 83.398,1.325 85.078,1.325 85.107,1.354 85.439,1.354 85.468,1.325 85.748,1.325 89.573,5.15 100.078,5.15 100.248,4.98 R188.1@103.248,4.98 103.453,4.775 IC33.3@104.798,4.775
NetIC33_7: IC33.7 R194.2 | length 1.7
  BottomLayer w0.125: IC33.7@109.198,4.125 110.453,4.125 110.53,4.203 110.55,4.203 110.778,4.43 R194.2@110.778,4.45
NetIC34_14: IC34.14 R233.1 R235.2 | length 2.5
  TopLayer w0.3: v2(83.693,12.742) 83.7,12.734 IC34.14@83.7,11.949
  BottomLayer w0.3: v2(83.693,12.742) 83.721,12.769 83.721,13.34 83.861,13.48 R233.1@84.748,13.48
NetIC34_15: IC34.15 R234.2 | length 1.8
  TopLayer w0.2: IC34.15@83.2,11.949 83.2,12.932 83.538,13.27 83.538,13.29 83.728,13.48 R234.2@83.748,13.48
NetIC34_29: IC34.29 R223.1 T9.2 | length 11.1
  TopLayer w0.15: R223.1@67.248,9.48 67.393,9.335 T9.2@68.798,9.335 70.038,9.335 70.548,8.825 77.098,8.825 77.459,9.186 77.937,9.186 IC34.29@77.95,9.199
NetIC34_31: IC34.31 R222.1 T9.4 | length 11.7
  TopLayer w0.15: R222.1@67.248,6.98 67.433,6.795 T9.4@68.798,6.795 71.393,6.795 73.173,8.575 77.123,8.575 77.472,8.226 77.924,8.226 IC34.31@77.95,8.199
NetIC34_38: IC34.38 R242.2 R243.2 | length 3
  TopLayer w0.2: v2(78.823,4.2) 79.181,4.558 79.181,4.93 IC34.38@79.2,4.949
  BottomLayer w0.2: v2(78.823,4.2) 78.823,3.595 R243.2@78.998,3.42 R242.2@80.248,3.42
NetIC34_39: IC34.39 R220.2 | length 1.8
  TopLayer w0.2: R220.2@78.998,3.42 79.183,3.605 79.183,3.86 79.7,4.377 IC34.39@79.7,4.949
NetIC34_41: IC34.41 R241.2 | length 1.7
  TopLayer w0.2: R241.2@80.248,3.42 80.268,3.42 80.458,3.61 80.458,3.63 80.7,3.872 IC34.41@80.7,4.949
NetIC34_46: IC34.46 R229.2 | length 1.7
  TopLayer w0.2: IC34.46@83.2,4.949 83.2,4.647 83.248,4.6 R229.2@83.248,3.25
NetIC34_48: IC34.48 R228.1 R231.2 | length 3.3
  TopLayer w0.2: IC34.48@84.2,4.949 84.2,4.573 v2(84.623,4.15)
  BottomLayer w0.2: R231.2@83.498,2.92 R228.1@84.498,2.92 84.623,3.045 v2(84.623,4.15)
NetIC36_2: IC36.2 R254.1 | length 1.6
  BottomLayer w0.09: IC36.2@101.248,72.05 101.248,71.923 101.328,71.843 101.455,71.843 102.033,71.265 102.033,71.195 R254.1@102.278,70.95
NetIC38_1: IC38.1 IC38.11 R125.1 R199.1 R257.1 | length 13.5
  TopLayer w0.25: R125.1@181.55,3.25 181.55,4.207 181.725,4.382 v5(181.725,4.477) 182.125,4.875 182.375,4.875 182.7,5.2 R257.1@182.7,6.25
  BottomLayer w0.25: IC38.1@177.598,7.475 177.598,4.127 178.5,3.225 179.548,3.225 ; IC38.11@179.548,1.675 179.548,3.225 ; v5(181.725,4.477) 180.8,4.477 179.548,3.225
NetIC38_2: IC38.2 IC38.3 R125.2 R281.2 | length 9.8
  TopLayer w0.15: v1(178.425,4.075) 178.425,3.759 178.939,3.245 R125.2@179.731,3.245 179.731,3.195 179.356,2.82 179.306,2.82 178.886,2.4 R281.2@178.886,1.755
  BottomLayer w0.15: IC38.2@178.248,7.475 178.248,5.325 ; v1(178.425,4.075) 178.425,4.111 178.248,4.288 178.248,5.325 ; IC38.3@178.898,7.475 178.8,7.377 178.8,5.475 178.65,5.325 178.248,5.325
NetIC38_8: IC38.8 R261.1 R265.1 | length 11.4
  TopLayer w0.15: v1(181.05,5.625) 180.8,5.875 R265.1@180.8,8.5 R261.1@182.225,8.5
  BottomLayer w0.15: v1(181.05,5.625) 182.25,5.625 183.475,4.4 183.475,2.75 182.4,1.675 IC38.8@181.498,1.675
NetIC38_9: IC38.9 IC38.10 R199.2 R257.2 R261.2 | length 11.3
  TopLayer w0.15: v5@182.896,4.211 183.295,4.211 183.909,4.825 183.925,4.825 184.3,5.2 R199.2@184.3,5.25
  TopLayer w0.25: R261.2@183.825,8.5 183.825,8.45 184.15,8.125 184.154,8.125 184.3,7.979 R257.2@184.3,6.75 R199.2@184.3,5.25
  BottomLayer w0.15: IC38.10@180.198,1.675 180.198,2.998 180.502,3.302 180.848,3.302 ; IC38.9@180.848,1.675 180.848,3.302 ; v5(182.8,4.1) 182.002,3.302 180.848,3.302
NetIC39_4: IC39.4 R266.2 | length 1.7
  TopLayer w0.3: R266.2@170.082,5.045 IC39.4@171.798,5.045
NetIC41_2: IC41.2 R117.1 | length 1.1
  BottomLayer w0.127: IC41.2@53.7,65.825 53.7,64.905 R117.1@53.805,64.8
NetIC46_9: IC46.9 R196.2 | length 3.9
  TopLayer w0.125: IC46.9@100.175,8.25 100.18,8.245 100.18,7.87 100.667,7.383 103.188,7.383 R196.2@103.405,7.6
NetIC46_14: IC46.14 R195.1 R198.2 | length 3.4
  TopLayer w0.25: IC46.14@101.125,10.1 102.656,10.1 102.89,10.334 103.289,10.334 R198.2@103.405,10.45 R195.1@103.405,11.425
NetIC46_15: IC46.15 R289.2 R290.2 | length 3.7
  TopLayer w0.125: IC46.15@101.125,10.55 v1(102.35,10.55) ; v1(103.1,9.8) 103.4,9.5 R290.2@103.405,9.5 R289.2@103.405,8.55
  MidLayer2 w0.125: v1(102.35,10.55) v1(103.1,9.8)
NetJ2_14: J2.14 R93.2 | length 2.7
  TopLayer w0.125: J2.14@140.748,67.825 140.748,66.23 141.281,65.697 141.301,65.697 R93.2@141.528,65.47
NetJ4_2: J4.2 R13.2 R14.1 TR1.6 | length 22.8
  TopLayer w0.25: R14.1@176.931,56.222 178.046,56.222 TR1.6@178.051,56.227 178.306,56.482 178.757,56.482 179.112,56.837 190.491,56.837 J4.2@191.491,57.837 J4.2@194.031,57.837 J4.2@194.031,55.297 J4.2@191.491,55.297
NetLD1_1: LD1.1 T16.3 | length 3.4
  TopLayer w0.125: LD1.1@28.325,0 28.475,-0.15 v2(29.6,-0.15)
  BottomLayer w0.125: v2(29.6,-0.15) 30.6,-1.15 T16.3@31.25,-1.15
NetLD1_2: LD1.2 R76.1 | length 2.6
  TopLayer w0.125: v2(25.7,-0.825) 25.772,-0.753 25.922,-0.753 LD1.2@26.675,0
  BottomLayer w0.125: v2(25.7,-0.825) 26.355,-0.825 26.533,-1.003 26.553,-1.003 26.78,-1.23 R76.1@26.78,-1.25
NetLD2_1: LD2.1 T3.3 | length 22.2
  BottomLayer w0.125: LD2.1@-5.1,22.9 2.082,22.9 2.55,22.432 10.005,22.432 14.273,26.7 T3.3@15.098,26.7
NetLD2_2: LD2.2 R44.1 | length 4.1
  BottomLayer w0.125: LD2.2@-5.1,20.95 -2.727,20.95 -1.947,21.73 -1.947,22.048 R44.1@-1.72,22.275
NetLD3_1: LD3.1 T8.3 | length 2.4
  TopLayer w0.125: LD3.1@42.25,9.825 42.3,9.875 v2(42.3,10.624)
  BottomLayer w0.125: v2(42.3,10.624) 42.613,10.937 43.213,10.937 43.45,11.175 T8.3@43.45,11.375
NetLD3_2: LD3.2 R207.1 | length 1.7
  TopLayer w0.125: LD3.2@42.25,8.175 42.425,8.35 v2(43.075,8.35)
  BottomLayer w0.125: v2(43.075,8.35) 43.805,8.35 R207.1@43.85,8.305
NetLD4_2: LD4.2 R224.1 | length 2.9
  TopLayer w0.127: v2(59.775,8.125) 60.988,8.125 LD4.2@61,8.137
  BottomLayer w0.127: R224.1@59.75,9.78 59.775,9.755 v2(59.775,8.125)
NetLD5_2: LD5.2 R225.1 | length 2.2
  TopLayer w0.127: v2(54.975,8.2) 56.25,8.2 LD5.2@56.312,8.137
  BottomLayer w0.127: v2(54.975,8.2) 54.975,9.005 R225.1@55,9.03
NetLD6_1: LD6.1 T10.3 | length 1.8
  TopLayer w0.125: v2(61,4.3) LD6.1@61,5.2
  BottomLayer w0.125: T10.3@61,3.4 v2(61,4.3)
NetLD6_2: LD6.2 R249.1 | length 2.3
  TopLayer w0.125: v2(59.775,7.5) 60.35,7.5 LD6.2@61,6.85
  BottomLayer w0.125: R249.1@59.75,6.72 59.775,6.745 v2(59.775,7.5)
NetLD7_1: LD7.1 T11.3 | length 1.8
  TopLayer w0.256: v2(42.225,4.375) 42.225,5.15 LD7.1@42.25,5.175
  BottomLayer w0.256: v2(42.225,4.375) 42.237,4.363 42.237,3.413 T11.3@42.25,3.4
NetLD7_2: LD7.2 R250.1 | length 2
  TopLayer w0.256: LD7.2@42.25,6.825 42.903,7.478 42.978,7.478 v2(43.025,7.525)
  BottomLayer w0.256: v2(43.025,7.525) 43.05,7.525 43.655,6.92 R250.1@43.675,6.92
NetLD8_1: LD8.1 T12.3 | length 1.9
  TopLayer w0.125: v2(51.525,4.325) 51.525,5.1 LD8.1@51.625,5.2
  BottomLayer w0.125: T12.3@51.5,3.4 51.525,3.425 v2(51.525,4.325)
NetLD8_2: LD8.2 R236.1 | length 2.4
  TopLayer w0.256: v2(50.375,7.5) 50.441,7.5 50.541,7.4 50.55,7.4 50.828,7.122 51.353,7.122 LD8.2@51.625,6.85
  BottomLayer w0.256: R236.1@50.25,6.72 50.328,6.798 50.328,7.453 v2(50.375,7.5)
NetLD9_1: LD9.1 LD11.1 T13.3 | length 61.5
  TopLayer w0.256: v2(46.775,4.375) 46.775,5.038 LD9.1@46.937,5.2
  SignalLayer1 w0.254: LD11.1@0.41,21 0.745,21 1.448,21.703 1.628,21.703 2.275,22.35 11.191,22.35 15.225,18.316 15.225,11.834 20.959,6.1 29.6,6.1 30.127,5.573 34.073,5.573 34.338,5.838 37.987,5.838 38.675,5.15 40.075,5.15 41.575,6.65 43.65,6.65 45.925,4.375 v2(46.775,4.375)
  BottomLayer w0.256: T13.3@46.75,3.4 46.762,3.413 46.762,4.363 v2(46.775,4.375)
NetLD9_2: LD9.2 R237.1 | length 2.2
  TopLayer w0.256: v2(45.725,7.475) 46.312,7.475 LD9.2@46.937,6.85
  BottomLayer w0.256: v2(45.725,7.475) 45.738,7.462 45.738,6.732 R237.1@45.75,6.72
NetLD10_1: LD10.1 T14.3 | length 1.8
  TopLayer w0.125: v2(56.25,4.4) 56.25,5.138 LD10.1@56.312,5.2
  BottomLayer w0.125: T14.3@56.25,3.4 v2(56.25,4.4)
NetLD10_2: LD10.2 R238.1 | length 2.3
  TopLayer w0.125: v2(54.975,7.425) 55.737,7.425 LD10.2@56.312,6.85
  BottomLayer w0.125: v2(54.975,7.425) 54.975,6.745 R238.1@55,6.72
NetLD11_2: LD11.2 R166.1 | length 4.7
  BottomLayer w0.125: R166.1@2.9,16.67 2.94,16.71 2.94,17.705 3.363,18.127 3.363,19.626 2.94,20.049 2.94,20.99 LD11.2@2.95,21
NetLD11_4: LD11.4 R186.1 | length 2.9
  BottomLayer w0.125: LD11.4@8.03,21 8.456,21 8.954,20.503 10.333,20.503 10.56,20.73 R186.1@10.56,20.75
NetLD12_2: LD12.2 R160.1 | length 1.9
  TopLayer w0.256: v2(50.525,8.325) 50.712,8.137 LD12.2@51.625,8.137
  BottomLayer w0.256: R160.1@50.5,9.03 50.512,9.018 50.512,8.337 v2(50.525,8.325)
NetLD13_1: LD13.1 R287.2 | length 3
  BottomLayer w0.125: LD13.1@-5.1,16.25 -4.225,16.25 -3.95,16.525
  BottomLayer w0.127: -3.95,16.525 -2.42,16.525 R287.2@-2.27,16.375
NetLD14_1: LD14.1 T20.3 | length 2.1
  TopLayer w0.125: LD14.1@46.937,9.825 46.975,9.862 v2(46.975,10.624)
  BottomLayer w0.125: v2(46.975,10.624) 46.975,11.825 T20.3@47,11.85
NetLD14_2: LD14.2 R165.1 | length 2.6
  TopLayer w0.256: v2(45.8,8.475) 46.637,8.475 LD14.2@46.937,8.175
  BottomLayer w0.256: R165.1@45.75,9.78 45.775,9.755 45.775,8.5 v2(45.8,8.475)
NetLD15_1: LD15.1 T21.3 | length 4
  BottomLayer w0.127: LD15.1@-5.1,8.2 -3.675,8.2 -2.45,6.975 T21.3@-1.6,6.975
NetLD15_2: LD15.2 R178.1 | length 4
  BottomLayer w0.125: LD15.2@-5.1,6.2 -4.325,6.2 -2.925,4.8 R178.1@-1.697,4.8
NetLD18_1: LD18.1 T19.3 | length 21.7
  BottomLayer w0.1: LD18.1@-5.1,19.6 0.566,19.6 1.68,20.714 1.68,21.286 2.494,22.1 8.486,22.1 8.886,21.7 T19.3@14.898,21.7
  BottomLayer w0.125: T19.3@14.898,21.7 T19.3@15.098,21.7
NetLD18_2: LD18.2 R226.1 | length 3.8
  BottomLayer w0.1: -4.325,17.6 -3.3,17.6 -1.92,18.98 R226.1@-1.92,19
  BottomLayer w0.125: LD18.2@-5.1,17.6 -4.325,17.6
NetR27_1: R27.1 T1.2 T2.3 | length 7
  TopLayer w0.25: R27.1@128.248,82.95 128.248,83.75 128.423,83.925 128.623,83.925 128.798,84.1 128.798,85.225 v2(128.773,85.25)
  BottomLayer w0.25: T2.3@126.648,88.7 126.648,87.375 v2(128.773,85.25)
NetR38_2: R38.2 R130.1 | length 0.9
  TopLayer w0.125: R38.2@186.87,7.65 187.755,7.65 R130.1@187.78,7.625
NetR39_2: R39.2 R131.1 | length 0.9
  TopLayer w0.125: R39.2@186.87,10.75 R131.1@187.805,10.75
NetR40_2: R40.2 R136.1 | length 3.3
  TopLayer w0.125: R40.2@186.87,11.85 188.507,11.85 188.584,11.927 188.916,11.927 189.42,11.423 189.42,11.252 R136.1@189.642,11.03
NetR41_2: R41.2 R138.1 | length 2.8
  TopLayer w0.125: R41.2@186.87,6.75 187.95,6.75 188.25,7.05 R138.1@189.58,7.05
NetR80_1: R80.1 SW1.4 | length 3.9
  TopLayer w0.125: SW1.4@96.739,75.489 97.841,75.489 98.007,75.323 98.007,74.98 98.234,74.752 100.089,74.752 R80.1@100.139,74.701
NetR105_1: R105.1 R111.1 R114.1 R116.2 T5.1 T6.1 | length 38.3
  BottomLayer w0.125: R111.1@116.08,39.575 114.825,39.575 113.775,38.525 113.775,36.4 114.855,35.32 R105.1@114.855,34.425 114.855,33.73 114.15,33.025 114.15,32.407 114.709,31.848 117.577,31.848 118.85,30.575 118.85,28.85 119.625,28.075 121.725,28.075 122.175,27.625 122.625,27.625 123.012,27.238 125.142,27.238 125.332,27.049 125.664,27.049 126.175,27.559 126.175,28.608 126.46,28.894 126.46,28.913 126.698,29.15 T6.1@126.898,29.15 126.898,31.15 127.961,32.213 127.961,32.339 127.962,32.341 127.962,32.413 T5.1@128.2,32.65 ; R114.1@122.718,32.95 127.25,32.95 127.55,32.65 T5.1@128.2,32.65 ; T5.1@128.4,32.65 T5.1@128.398,32.65 ; R116.2@128.555,34 128.555,32.807 T5.1@128.398,32.65 ; T5.1@128.2,32.65 T5.1@128.398,32.65
NetR108_1: R108.1 R109.1 T4.3 | length 3.4
  BottomLayer w0.125: T4.3@119.498,30.3 120.725,30.3 121.045,29.98 R109.1@121.748,29.98 R108.1@122.748,29.98
NetR133_1: R133.1 R276.2 | length 2.3
  TopLayer w0.114: R276.2@186.845,3.85 189.105,3.85 R133.1@189.155,3.8
NetR140_1: R140.1 R270.2 | length 2.8
  TopLayer w0.125: R270.2@186.87,13.125 186.879,13.134 R140.1@189.675,13.134
NetR189_2: R189.2 R190.1 | length 1
  TopLayer w0.3: R189.2@121.468,0.7 121.468,1.7 R190.1@121.498,1.73
NetR193_1: R193.1 R195.2 | length 0.9
  TopLayer w0.25: R195.2@104.345,11.425 R193.1@105.255,11.425
NetR201_2: R201.2 R202.1 | length 1
  TopLayer w0.3: R202.1@125.998,1.73 126.028,1.7 R201.2@126.028,0.7
NetR218_2: R218.2 W1.2 | length 2.5
  TopLayer w0.3: R218.2@86.968,0.7 86.968,0.68 87.108,0.54 87.128,0.54 87.538,0.13 W1.2@87.538,-1.55
NetR219_2: R219.2 W2.2 | length 2.1
  TopLayer w0.3: R219.2@76.498,0.48 76.498,-1.34 W2.2@76.708,-1.55
NetR243_1: R243.1 R244.2 | length 1
  BottomLayer w0.2: R243.1@78.998,2.48 79.028,2.45 R244.2@79.028,1.45
NetR264_1: R264.1 T15.3 | length 1.4
  BottomLayer w0.25: R264.1@171.709,1.652 T15.3@171.709,3.077
NetR267_1: R267.1 T24.1 T25.3 | length 4.2
  TopLayer w0.25: T24.1@180.95,12.4 181.05,12.5 T25.3@181.05,16.565
NetR274_1: R274.1 R275.2 | length 0.9
  TopLayer w0.125: R274.1@166.175,1.17 166.195,1.19 R275.2@166.195,2.071
NetR275_1: R275.1 T26.3 | length 1.3
  TopLayer w0.125: T26.3@164.925,3.025 164.939,3.011 R275.1@166.195,3.011
NetR279_2: R279.2 R280.2 | length 1.5
  TopLayer w0.15: R280.2@180.398,1.755 R279.2@181.936,1.755
NetR280_1: R280.1 R281.1 | length 1.5
  TopLayer w0.15: R281.1@178.886,0.155 R280.1@180.398,0.155
NetR287_1: R287.1 T23.3 | length 2.8
  BottomLayer w0.127: T23.3@-2.075,14.025 -1.875,14.025 -1.638,14.262 -1.638,15.078 -1.375,15.342 -1.375,16.33 R287.1@-1.33,16.375
OSC_EN: IC10.25 IC37.8 OSC1.1 R256.1 | length 188.2
  TopLayer w0.125: IC10.25@86.248,22.175 85.85,22.175 85.688,22.338 84.893,22.338 84.705,22.525 IC37.8@83.55,22.525 83.388,22.363 81.312,22.363 81.125,22.175 67.848,22.175 62.798,17.125 52.725,17.125 47.3,22.55 47.3,82.627 55.348,90.675 82.548,90.675 83.273,91.4 90.8,91.4 93.912,88.287 93.912,87.037 95.312,85.637 99.012,85.637 101.275,87.9 101.275,89.775 102.9,91.4 117.863,91.4 OSC1.1@119.188,90.075 ; OSC1.1@119.258,90.145 R256.1@121.173,90.145
OSC_N: C30.1 OSC1.5 R21.1 | length 7.8
  TopLayer w0.085: C30.1@111.048,85.45 111.048,85.55 111.215,85.717 111.234,85.717 111.283,85.767 111.283,86.308 112.849,87.873 115.31,87.873 115.484,87.699 115.484,87.475 115.777,87.183 115.791,87.183 OSC1.5@116.648,86.325
OSC_P: C29.1 OSC1.4 R20.1 | length 8.4
  TopLayer w0.085: C29.1@111.048,84.2 111.048,84.3 111.215,84.467 111.316,84.467 111.495,84.647 111.495,85.609 111.495,86.221 112.936,87.661 115.222,87.661 115.272,87.612 115.272,87.475 114.979,87.183 114.966,87.183 OSC1.4@114.108,86.325
P1V0: C103.1 C104.2 C105.2 C106.2 C107.2 C108.2 C109.2 C145.2 C146.2 C147.2 C148.2 C149.2 C150.2 C151.2 C152.2 C236.2 C308.2 C309.2 C310.2 C311.2 C312.2 C313.2 C314.2 C315.2 C316.2 C317.2 C318.2 C319.2 IC4.H8 IC4.H10 IC4.J7 IC4.J9 IC4.K8 IC4.L7 IC4.M8 IC4.N7 IC4.P8 IC4.P10 IC4.R7 IC4.R9 IC4.T8 IC4.T10 L12.2 L14.2 L15.2 R233.2 T11.1 TP5.1 | length 99.7
  TopLayer w0.3: TP5.1@42.25,2.25 42.275,2.225 v2(42.275,1.125) ; v1(95.498,50.45) IC4.R7@95.998,50.95 ; v1(95.498,52.45) IC4.N7@95.998,52.95 ; v1(95.498,55.45) IC4.L7@95.998,54.95 ; v1(95.498,57.45) IC4.J7@95.998,56.95 ; v1(96.498,49.45) IC4.T8@96.998,49.95 ; v1(96.498,51.45) IC4.P8@96.998,51.95 ; v1(96.498,53.45) IC4.M8@96.998,53.95 ; v1(96.498,56.45) IC4.K8@96.998,55.95 ; v1(96.498,58.45) IC4.H8@96.998,57.95 ; v1(97.498,50.45) IC4.R9@97.998,50.95 ; v1(97.498,57.45) IC4.J9@97.998,56.95 ; v1(98.498,49.45) IC4.T10@98.998,49.95 ; v1(98.498,51.45) IC4.P10@98.998,51.95 ; v1(98.498,58.45) IC4.H10@98.998,57.95
  TopLayer w0.762: C103.1@97.598,32.725 97.614,32.741 v4(99.365,32.741)
  TopLayer w0.8: C103.1@97.598,32.725 C103.1@97.598,32.775 ; v4(97.748,34.95) 97.598,34.8 C103.1@97.598,32.775 ; v4(98.748,34.95) 98.748,33.925 C103.1@97.598,32.775
  SignalLayer1 w0.3: v2(42.275,1.125) 44.24,1.125 45.79,2.675 51.025,2.675 61.45,13.1 71.398,13.1 72.748,11.75 72.748,11.725 73.773,10.7 75.373,10.7 76.623,11.95 81.723,11.95 84.173,14.4 v2(85.473,14.4) 85.473,17.375 89.348,21.25 94.777,21.25 96.502,19.525 101.9,19.525 102.328,19.097 v4(107.175,19.097)
  BottomLayer w0.3: v2(42.275,1.125) 43.175,1.125 T11.1@43.2,1.1 ; R233.2@84.748,14.42 84.758,14.41 85.463,14.41 v2(85.473,14.4) ; 94.998,50.95 v1(95.498,50.45) ; v1(95.498,57.45) 95.775,57.173 95.775,56.975 95.825,56.925 C315.2@95.85,56.925 ; C106.2@100.048,57.95 C104.2@100.048,58.95
  other v4: 107.175,17.475 108.1,17.5 109,17.5 107.6,18.299 108.55,18.299 108.1,19.072 109,19.072
P1V0_NF: C70.2 C71.2 C239.2 C240.2 L8.2 L12.1 L14.1 L15.1 L16.1 L18.1 R193.2 | length 9.5
  TopLayer w0.3: R193.2@106.195,11.425 106.195,11.445 106.335,11.585 106.355,11.585 107.426,12.656 108.131,12.656 L16.1@108.2,12.725
  TopLayer w0.8: L15.1@104.4,16.652 104.5,16.552 104.5,15.85 105.025,15.325 107.575,15.325 108.2,14.7 L16.1@108.2,12.725
P1V2: C260.2 IC32.7 L23.1 R214.2 T13.1 TP7.1 | length 106.3
  TopLayer w0.35: v2(46.8,1.15) 46.8,2.113 TP7.1@46.937,2.25
  TopLayer w0.4: IC32.7@127.248,8.2 127.96,8.2 128.521,7.639 130.184,7.639 130.314,7.509 130.964,7.509 C260.2@130.973,7.5 ; C260.2@130.986,7.513 131.083,7.61 131.183,7.61 131.374,7.801 131.403,7.801 131.572,7.97 131.572,7.996 131.806,8.23 131.978,8.23 R214.2@132.023,8.275 ; R214.2@131.998,8.32 132.018,8.32 132.385,8.687 133.761,8.687 134.329,8.119 134.329,7.344 v2(134.348,7.325)
  SignalLayer1 w0.4: v2(46.8,1.15) 47.573,0.377 57.102,0.377 59.125,2.4 61.675,2.4 63.275,4 75.598,4 76.848,5.25 84.198,5.25 85.373,6.425 102.191,6.425 103.311,7.546 108.231,7.546 109.551,6.226 112.699,6.226 116.5,2.425 130.025,2.425 134.329,6.729 v2@134.329,7.306
  BottomLayer w0.35: v2(46.8,1.15) 46.841,1.15 46.891,1.1 T13.1@47.7,1.1